# Altium PCB Grantv3.PcbDoc (part 5 of 5)
Units mil, origin at the board's own origin, x right, y up, seen from the top; angles counter-clockwise.
Board outline 3031.03 x 2829.03 mil, 2 copper layers (Top Layer, Bottom Layer); 187 components, 111 nets, 634 pads, 178 vias.
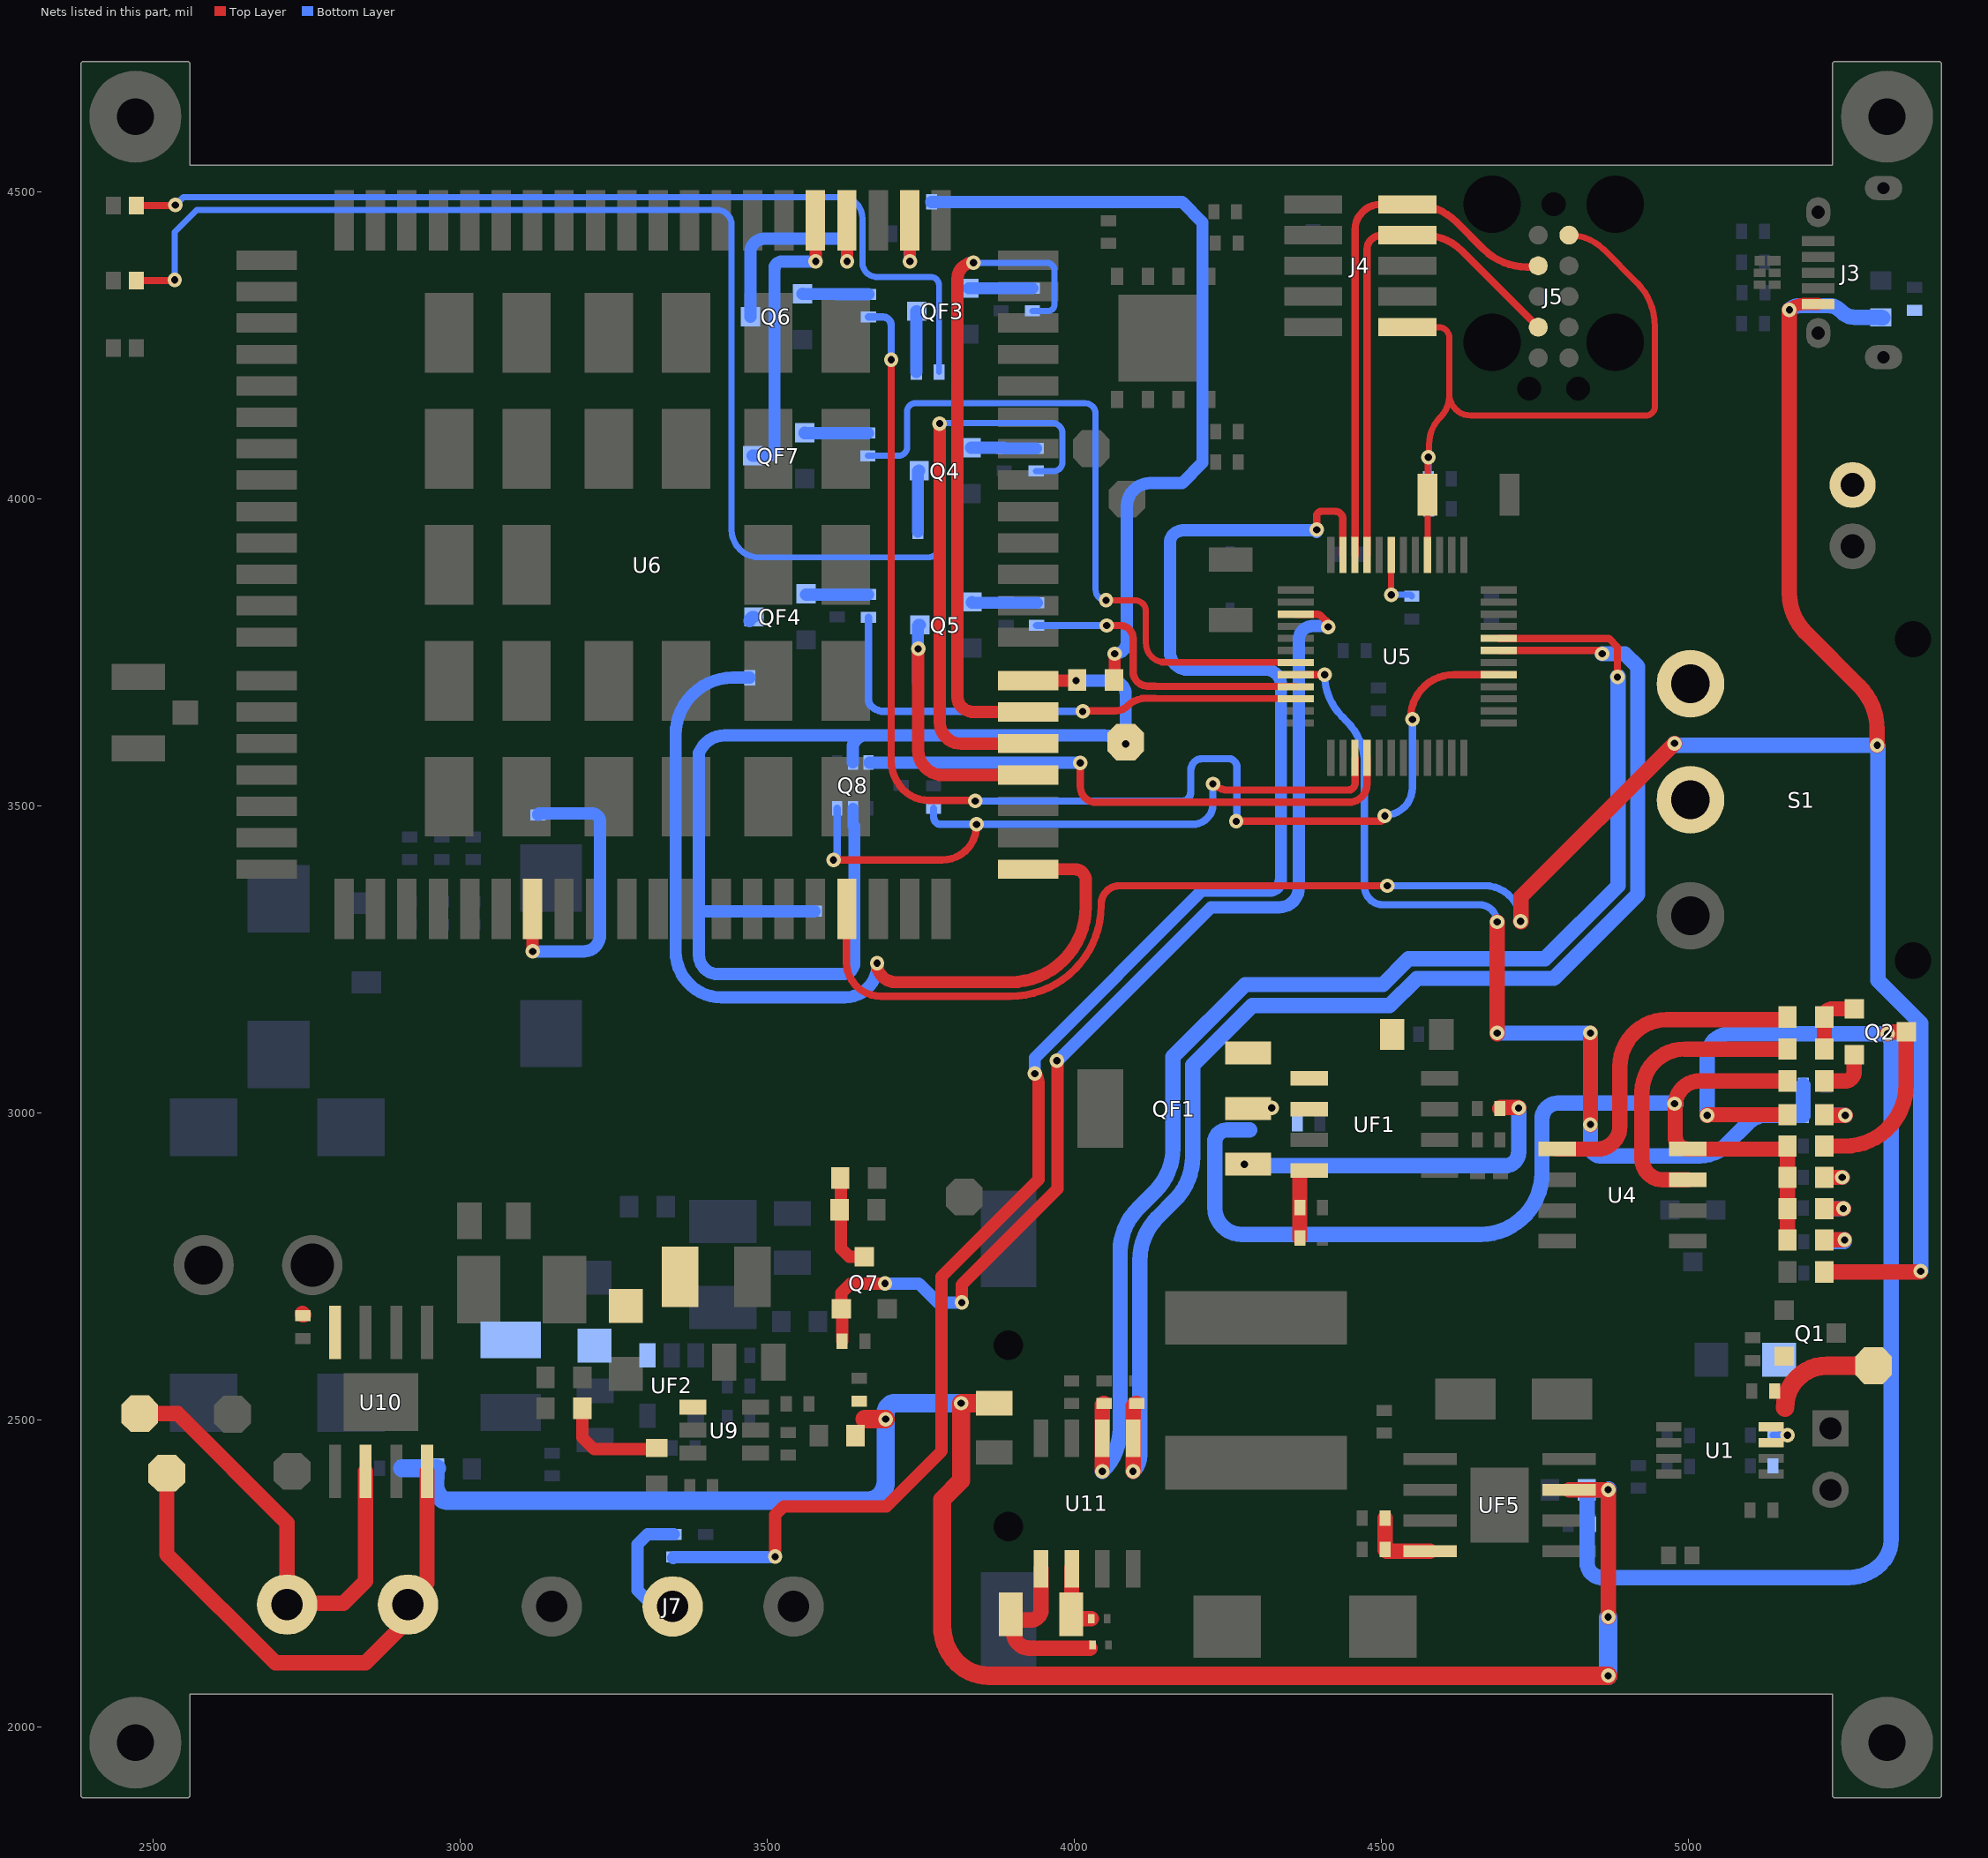
[diagram p3: the nets of this part, all layers, seen from the top]

## Via types
v1: diameter 23.62, hole 11.81, Top Layer to Bottom Layer, 178 vias

## Nets (pads, with @x,y where several pads share a name; then routed paths per layer and width w, separated by ;. In a path a pad name is that pad's centre, name@x,y a point inside that pad or via, vN(x,y) a via of type N, cw(c..) or ccw(c..) an arc to the next point about the centre after c; other vN are vias at no path point) (continued)
NetLED4_2: LED4.2 R11.2 | length 1972.4
  Top Layer w12: LED4.2@2471.64,4356 LED4.2@2472.64,4356 v1@2535,4356
  Bottom Layer w10: v1@2535,4358 2535,4435 2571,4471 3418.2,4471 cw(c3418.2,4447.2) 3442,4447.2 3442,3950 ccw(c3487,3950) 3487,3905 3762,3905 ccw(c3762,3925.5) 3782.5,3925.5 R11.2@3782.5,3947
  other v1: 2535,4357
NetLEDF1_2: LEDF1.2 R31.2 | length 1569.3
  Top Layer w12: LEDF1.2@2472.64,4478 v1@2536,4478
  Bottom Layer w10: v1(2536,4479) 2549,4492 3621,4492 cw(c3621,4458) 3655,4458 3655,4385 ccw(c3678,4385) 3678,4362 ; 3676,4362 3678,4362 ; R31.2@3780,4207 3780,4348 ccw(c3766,4348) 3766,4362 3678,4362
NETMODE_: R13.2 U6.5 | length 959
  Top Layer w20: v1(3781,4123) 3781,3637 ccw(c3816.7,3637) 3816.7,3601.3 U6.5@3924.68,3601.3
  Bottom Layer w10: v1@3780,4124 3964,4124 cw(c3964,4107) 3981,4107 3981,4060 cw(c3966.5,4060) 3966.5,4045.5 R13.2@3938,4045.5
NetQ2_1: Q2.1 SB16.2 SB17.2 | length 108.3
  Top Layer w25: SB17.2@5222,3104 SB16.2@5222,3156 cw(c5235.41,3156) 5235.41,3169.41 Q2.1@5270.68,3169.41
NetQ2_2: Q2.2 SB20.2 | length 84.7
  Top Layer w25: SB20.2@5222,3052 5255.32,3052 ccw(c5255.32,3067.35) 5270.68,3067.35 Q2.2@5270.68,3094.6
NetQ4_1: Q4.1 R13.1 R16.1 | length 106.2
  Bottom Layer w20: Q4.1@3832.32,4083.41 3885.09,4083.41 cw(c3885.09,4082.5) R16.1@3886,4082.5 R13.1@3938,4082.5
NetQ4_3: Q4.3 R11.1 | length 100.2
  Bottom Layer w20: R11.1@3745.5,3947 3745.5,4043.83 cw(c3747.68,4043.83) Q4.3@3747.68,4046.01
NetQ5_1: Q5.1 R14.1 R17.1 | length 106.5
  Bottom Layer w20: Q5.1@3833.32,3832.41 ccw(c3834.73,3832.41) 3834.73,3831 R14.1@3939,3831
NetQ6_1: Q6.1 R18.1 R19.1 | length 108.6
  Bottom Layer w20: Q6.1@3557.32,4334.41 3557.32,4334 R19.1@3613,4334 3613,4333.5 R18.1@3665,4333.5
NetQ7_3: Q7.3 SB_AD.2 SB_ZD.2 | length 157.1
  Top Layer w20: SB_ZD.2@3619,2892 3620,2891 3620,2779 3633.68,2765.32 Q7.3@3657.99,2765.32
NetQF1_1: QF1.1 RF2.1 | length 569.5
  Top Layer w25: v1(4277.17,2916.17) QF1.1@4277.17,2916.45 ; RF2.1@4693.56,3007 cw(c4695.56,3007) 4695.56,3009 4723,3009 cw(c4723,3007.94) v1(4724.06,3007.94)
  Bottom Layer w25: v1(4277.17,2916.17) cw(c4275,2916.17) 4275,2914 4702.06,2914 ccw(c4702.06,2936) 4724.06,2936 v1(4724.06,3007.94)
NetQF3_1: QF3.1 RF7.1 RF8.1 | length 103.7
  Bottom Layer w20: QF3.1@3828.32,4343.41 RF8.1@3881,4343.41 RF7.1@3932,4343.41
NetQF3_3: QF3.3 R31.1 | length 99.7
  Bottom Layer w20: R31.1@3743,4207 3743,4306.01 QF3.3@3743.68,4306.01
NetQF4_1: QF4.1 RF10.1 RF11.1 | length 100.8
  Bottom Layer w20: QF4.1@3563.32,3844.41 RF10.1@3664.09,3844.41
NetQF7_1: QF7.1 RF13.1 RF14.1 | length 103.3
  Bottom Layer w20: QF7.1@3561,4107.8 3561,4107.5 RF14.1@3612,4107.5 RF13.1@3664,4107.5
NetR6_2: R6.2 SB15.2 | length 64.2
  Top Layer w25: SB15.2@5222,2793 v1(5255,2793)
  Bottom Layer w25: R6.2@5225.5,2790 5252,2790 ccw(c5252,2793) v1(5255,2793)
NetR7_2: R7.2 SB19.2 | length 60.1
  Top Layer w25: SB19.2@5222,2844 v1(5253,2844)
  Bottom Layer w25: R7.2@5224.5,2845 ccw(c5225.5,2845) 5225.5,2844 v1(5253,2844)
NetR12_2: R12.2 SB4.2 | length 1301.1
  Top Layer w20: SB4.2@4064,3705 ccw(c4064,3707) 4066,3707 v1(4066,3748)
  Bottom Layer w20: R12.2@3767.5,4484 4176,4484 4209,4451 4209,4059 4176,4026 4124,4026 ccw(c4124,3988) 4086,3988 4086,3768 cw(c4066,3768) v1(4066,3748)
NetR21_1: R21.1 SB13.1 | length 176.9
  Top Layer w20: SB13.1@3199,2519 3199,2471 3218,2452 R21.1@3320,2452
NetR101_1: R101.1 U10.4 | length 3.1
  Top Layer w25: R101.1@2743,2673 ccw(c2745,2673) R101.1@2745,2671
NetRP1_2: RP1.2 SB18.2 | length 55.5
  Top Layer w25: SB18.2@5222,2895 v1(5251,2895)
  Bottom Layer w25: RP1.2@5224.5,2895 v1(5251,2895)
NetRP3_2: RP3.2 SB14.2 | length 66.1
  Top Layer w25: SB14.2@5222,2997 ccw(c5223,2997) 5223,2996 v1(5256,2996)
  Bottom Layer w25: RP3.2@5224.5,2996 v1(5256,2996)
NetSB16_1: SB16.1 U4.1 | length 539.7
  Top Layer w25: U4.1@4786.7,2941 4852,2941 ccw(c4852,2978) 4889,2978 4889,3075.19 cw(c4965.81,3075.19) 4965.81,3152 5158,3152 ccw(c5158,3156) SB16.1@5162,3156
NetSB17_1: SB17.1 U4.7 | length 479.8
  Top Layer w25: U4.7@4999.3,2891 4959,2891 cw(c4959,2925) 4925,2925 4925,3034.22 cw(c4994.77,3034.22) 4994.77,3104 SB17.1@5162,3104
NETSTATUS_: RF7.2 U6.6 | length 1130.4
  Top Layer w20: v1(3836,4385) ccw(c3836,4359) 3810,4359 3810,3676.49 ccw(c3830.49,3676.49) 3816,3662 ccw(c3837.73,3683.73) 3837.73,3653 U6.6@3931,3653 ; U6.6@3892.13,3652.87 U6.6@3925.07,3652.87
  Bottom Layer w10: v1@3835,4384 cw(c3837,4384) v1@3837,4386 ; v1(3836,4385) 3955,4385 cw(c3955,4372) 3968,4372 ; RF7.2@3932,4306.41 3957.41,4306.41 ccw(c3957.41,4317) 3968,4317 3968,4372 ; 3968,4373 3968,4372
NRST_: C18.1 J4.10 J5.10 R9.1 SW1.1 U5.40 | length 1241.7
  Top Layer w10: J4.10@4543,4280 4594,4280 cw(c4594,4263) 4611,4263 4611,4171 ; U5.40@4575.57,3908.83 SW1.1@4575.64,4007 SW1.1@4575.64,4007 4576,4007 v1@4576,4069 ; v1@4578,4068 4578,4088.13 cw(c4642.87,4088.13) 4597,4134 ccw(c4563.2,4167.8) 4611,4167.8 4611,4171 ; J5.10@4806,4430 cw(c4806,4350.33) 4862.33,4406.67 4916.71,4352.29 cw(c4846,4281.58) 4946,4281.58 4946,4151 cw(c4931,4151) 4931,4136 4646,4136 cw(c4646,4171) 4611,4171 ; v1@4576,4069 cw(c4576,4068) v1@4576.17,4068.98 ; v1@4576,4069 v1@4576.17,4068.98 ; v1@4576.17,4068.98 cw(c4576,4068) v1@4576.34,4068.94 ; v1@4576.17,4068.98 v1@4576.34,4068.94 ; v1@4576.34,4068.94 cw(c4576,4068) v1@4576.5,4068.87 ; v1@4576.34,4068.94 v1@4576.5,4068.87 ; v1@4576.5,4068.87 cw(c4576,4068) v1@4576.64,4068.77 ; v1@4576.5,4068.87 v1@4576.64,4068.77 ; v1@4576.64,4068.77 cw(c4576,4068) v1@4576.77,4068.64 ; v1@4576.77,4068.64 cw(c4576,4068) v1@4576.87,4068.5 ; v1@4576.77,4068.64 v1@4576.87,4068.5 ; v1@4576.87,4068.5 cw(c4576,4068) v1@4576.94,4068.34 ; v1@4576.87,4068.5 v1@4576.94,4068.34 ; v1@4576.94,4068.34 cw(c4576,4068) v1@4576.98,4068.17 ; v1@4576.94,4068.34 v1@4576.98,4068.17 ; v1@4576.98,4068.17 cw(c4576,4068) v1(4577,4068) v1@4576.98,4068.17
  Bottom Layer w10: v1(4577,4068) R9.1@4577,4033 4577,3984 C18.1@4577.5,3984
OUT_1: J8.1 P14.1 U10.6 | length 776.5
  Top Layer w25: P14.1@2475,2510 P14.1@2478,2510 2540,2510 2718,2332 J8.1@2718,2201 ; J8.1@2716,2201 J8.1@2718,2201 ; J8.1@2718,2196 J8.1@2718,2201 ; U10.6@2846,2415.81 2846,2237 2810,2201 J8.1@2718,2201
OUT_2: J8.2 P15.1 U10.8 | length 879.3
  Top Layer w25: P15.1@2522,2413 2522,2281 2699,2104 2846,2104 2920,2178 J8.2@2920,2192 ; J8.2@2911,2199 2946,2234 U10.8@2946,2415.81
PA2_: Q7.1 R26.1 U5.3 | length 1803.4
  Top Layer w12: U5.3@4361,3812.37 4394.86,3812.37 cw(c4394.86,3800.86) 4403,3809 4414.59,3797.41 cw(c4411.17,3794) 4416,3794 v1(4413.71,3791.71)
  Top Layer w20: R26.1@3622,2628 3622,2682 3620.59,2683.41 3620.59,2706.59 3636,2722 v1(3692,2722) ; v1(3817,2691) 3817,2720 3973,2876 3973,3086 v1(3972,3085)
  Bottom Layer w12: v1@4412,3791 ccw(c4412,3793.41) v1(4413.71,3791.71)
  Bottom Layer w20: v1(3692,2722) 3747,2722 3778,2691 v1(3817,2691) ; v1(3972,3085) 3973,3085 4223,3335 4334.04,3335 ccw(c4334.04,3366.96) 4366,3366.96 4366,3770.88 cw(c4388.12,3770.88) 4388.12,3793 v1@4413,3793
PA4_: R14.2 U5.9 | length 501.8
  Top Layer w12: v1(4053,3794) 4075,3794 cw(c4075,3773) 4096,3773 4096,3719 ccw(c4119.46,3719) 4119.46,3695.54 ; 4119,3695 4132.03,3695.06 U5.9@4361,3694.26
  Bottom Layer w12: R14.2@3939,3794 v1(4053,3794)
PA5_: RF10.2 U5.10 | length 845.4
  Top Layer w12: v1@4014,3655 4067.69,3655 ccw(c4067.69,3682.31) 4087,3663 cw(c4116.87,3633.13) 4116.87,3675.37 4131.96,3675.37 U5.10@4361,3674.57
  Bottom Layer w12: RF10.2@3665,3807.5 3665,3672.66 ccw(c3678.66,3672.66) 3669,3663 ccw(c3690.73,3684.73) 3690.73,3654 v1(4014,3654)
PA20_: R18.2 U5.29 | length 2121.7
  Top Layer w12: v1(3702,4227) 3702,3574.28 ccw(c3770.28,3574.28) 3722,3526 ccw(c3763.04,3567.04) 3763.04,3509 v1@3838,3509 ; v1@3838,3508 v1(3839,3508) ; v1(4264,3475) 4497,3475 ccw(c4497,3484) v1(4506,3484) ; v1(4551,3641) 4550,3641 4548,3643 cw(c4618.94,3643) 4618.94,3713.95 U5.29@4691.71,3713.95
  Bottom Layer w12: R18.2@3665,4296.5 3688.5,4296.5 cw(c3688.5,4283) 3702,4283 v1(3702,4227) ; v1(3839,3508) 4177.76,3508 ccw(c4177.76,3518.24) 4185,3511 ccw(c4172.93,3523.07) 4190,3523.07 4190,3557.51 cw(c4210.49,3557.51) 4196,3572 cw(c4208.07,3559.93) 4208.07,3577 4251.34,3577 cw(c4251.34,3563.34) 4261,3573 cw(c4251.34,3563.34) 4265,3563.34 v1@4265,3476 ; v1@4506,3485 ccw(c4506,3530) 4551,3530 v1(4551,3641)
PB8_: RF13.2 U5.7 | length 1165.1
  Top Layer w10: v1(4052,3835) 4099.1,3835 cw(c4099.1,3817.1) 4117,3817.1 4117,3765 ccw(c4148,3765) 4143.12,3734.39 ccw(c4148,3765) 4148,3734
  Top Layer w12: 4143.12,3734.39 4148,3734.37 U5.7@4361,3733.63
  Bottom Layer w10: RF13.2@3664,4070.5 3714,4070.5 ccw(c3714,4084.5) 3728,4084.5 3728,4143 cw(c3741,4143) 3741,4156 4017,4156 ; 4018,4156 cw(c4018,4139) 4035,4139 4035,3852 ccw(c4052,3852) v1(4052,3835) v1@4055.93,3835
PB9_: RP3.1 RP4.1 U5.8 | length 1605.8
  Top Layer w12: U5.8@4361,3713.94 v1(4408.06,3713.94)
  Top Layer w25: v1@4689,3129 v1(4689,3130) v1(4689,3311) ; v1(4841,2981) v1(4841,3130)
  Bottom Layer w12: v1(4408.06,3713.94) ccw(c4504.62,3713.94) 4436.34,3645.66 4443.71,3638.29 cw(c4373,3567.58) 4473,3567.58 4473,3369 ccw(c4503,3369) 4503,3339 4660,3339 cw(c4660,3310) v1@4689,3310
  Bottom Layer w25: v1(4689,3130) v1(4841,3130) ; v1(4841,2981) 4841,2946 ccw(c4857,2946) 4857,2930 5019.34,2930 ccw(c5019.34,2989.54) 5061.44,2947.44 5098,2984 cw(c5126.97,2955.03) 5126.97,2996 RP3.1@5187.5,2996 RP4.1@5187.5,3045
PWRKEY: QF7.3 U6.21 | length 476.6
  Top Layer w20: U6.21@3578.23,4454.43 U6.21@3578.61,4454.05 ; v1(3579,4387.09) U6.21@3579,4453.66
  Bottom Layer w20: QF7.3@3476.35,4070.4 3501.11,4070.4 ccw(c3501.11,4081.29) 3512,4081.29 3512,4375.09 cw(c3524,4375.09) 3524,4387.09 v1(3579,4387.09)
RESET_N: Q6.3 U6.20 | length 372.3
  Top Layer w20: v1(3630.18,4387.09) U6.20@3630.18,4453.66
  Bottom Layer w20: Q6.3@3472.68,4297.01 3472.68,4401.68 cw(c3495,4401.68) 3495,4424 3615.92,4424 cw(c3615.92,4409.73) 3630.18,4409.73 v1(3630.18,4387.09)
RXD: Q8.3 RS2.2 U5.15 | length 1167.4
  Top Layer w12: v1@3606,3414 ccw(c3608,3414) v1(3608,3412) 3785,3412 ccw(c3785,3468) v1@3841,3468 ; v1(3841,3470) v1@3842,3470 ; v1(4226,3536) ccw(c4250.14,3560.14) 4250.14,3526 4446.78,3526 ccw(c4446.78,3536.68) 4457.46,3536.68 U5.15@4457.46,3578.12
  Bottom Layer w12: v1(3608,3412) 3613,3412 ccw(c3613,3413) 3614,3413 Q8.3@3614,3496 ; RS2.2@3771,3496 3771,3482.66 ccw(c3784.66,3482.66) 3775,3473 ccw(c3782.24,3480.24) 3782.24,3470 v1(3841,3470) 4083.07,3470 ; 4084,3470 4192.86,3470 ccw(c4192.86,3504.14) 4217,3480 ccw(c4195.27,3501.73) 4226,3501.73 v1(4226,3536)
SCL_: R24.1 U5.32 U11.6 | length 2256.4
  Top Layer w12: U5.32@4691.71,3773 4727.91,3773 4871,3773 4885,3759 v1(4885,3710)
  Top Layer w25: v1@4046,2417 U11.6@4046,2470 R24.1@4046,2523.5 ; R24.1@4046,2523.5 cw(c4049,2523.5) R24.1@4046.05,2524.02 ; R24.1@4046,2523.5 R24.1@4046.05,2524.02 ; R24.1@4046.05,2524.02 cw(c4049,2523.5) R24.1@4046.18,2524.53 ; R24.1@4046.05,2524.02 R24.1@4046.18,2524.53 ; R24.1@4046.18,2524.53 cw(c4049,2523.5) R24.1@4046.4,2525 ; R24.1@4046.18,2524.53 R24.1@4046.4,2525 ; R24.1@4046.4,2525 cw(c4049,2523.5) R24.1@4046.7,2525.43 ; R24.1@4046.4,2525 R24.1@4046.7,2525.43 ; R24.1@4046.7,2525.43 cw(c4049,2523.5) R24.1@4047.07,2525.8 ; R24.1@4047.07,2525.8 cw(c4049,2523.5) R24.1@4047.5,2526.1 ; R24.1@4047.07,2525.8 R24.1@4047.5,2526.1 ; R24.1@4047.5,2526.1 cw(c4049,2523.5) R24.1@4047.97,2526.32 ; R24.1@4047.5,2526.1 R24.1@4047.97,2526.32 ; R24.1@4047.97,2526.32 cw(c4049,2523.5) R24.1@4048.48,2526.45 ; R24.1@4047.97,2526.32 R24.1@4048.48,2526.45 ; R24.1@4048.48,2526.45 cw(c4049,2523.5) R24.1@4049,2526.5 R24.1@4048.48,2526.45
  Bottom Layer w25: v1(4046,2416) ccw(c3975.99,2486.01) 4075,2486.01 4075,2773.74 cw(c4175,2773.74) 4104.29,2844.45 4131.71,2871.87 ccw(c4061,2942.58) 4161,2942.58 4161,3091.25 4278.75,3209 4502.75,3209 4544.75,3251 4767,3251 4886,3370 4886,3711 v1(4885,3710)
SDA_: R23.1 U5.31 U11.5 | length 2262.6
  Top Layer w12: U5.31@4691.71,3753.32 4854.69,3753.32 v1(4860,3748)
  Top Layer w25: v1(4096,2416) U11.5@4096,2470 R23.1@4096,2520.5 ; R23.1@4096,2520.5 cw(c4102,2520.5) R23.1@4096.09,2521.54 ; R23.1@4096,2520.5 R23.1@4096.09,2521.54 ; R23.1@4096.09,2521.54 cw(c4102,2520.5) R23.1@4096.36,2522.55 ; R23.1@4096.09,2521.54 R23.1@4096.36,2522.55 ; R23.1@4096.36,2522.55 cw(c4102,2520.5) R23.1@4096.8,2523.5 ; R23.1@4096.36,2522.55 R23.1@4096.8,2523.5 ; R23.1@4096.8,2523.5 cw(c4102,2520.5) R23.1@4097.4,2524.36 ; R23.1@4096.8,2523.5 R23.1@4097.4,2524.36 ; R23.1@4097.4,2524.36 cw(c4102,2520.5) R23.1@4098.14,2525.1 ; R23.1@4098.14,2525.1 cw(c4102,2520.5) R23.1@4099,2525.7 ; R23.1@4098.14,2525.1 R23.1@4099,2525.7 ; R23.1@4099,2525.7 cw(c4102,2520.5) R23.1@4099.95,2526.14 ; R23.1@4099,2525.7 R23.1@4099.95,2526.14 ; R23.1@4099.95,2526.14 cw(c4102,2520.5) R23.1@4100.96,2526.41 ; R23.1@4099.95,2526.14 R23.1@4100.96,2526.41 ; R23.1@4100.96,2526.41 cw(c4102,2520.5) R23.1@4102,2526.5 R23.1@4100.96,2526.41
  Bottom Layer w25: v1(4096,2416) ccw(c4069.44,2442.56) 4107,2442.56 4107,2759.58 cw(c4207,2759.58) 4136.29,2830.29 4163.71,2857.71 ccw(c4093,2928.42) 4193,2928.42 4193,3078 4290,3175 4514,3175 4558,3219 4781,3219 4918,3356 4918,3727 4897,3748 v1(4860,3748)
SENS_IN: J7.2 R27.2 | length 211
  Bottom Layer w20: J7.2@3348,2195 3316,2195 3289,2222 3289,2297 3305.5,2313.5 R27.2@3348,2313.5
SNS_: QF1.3 RF1.1 UF1.1
STATUS_: R10.1 U6.61 | length 492
  Top Layer w20: U6.61@3117.98,3332 v1(3118,3263) ; v1(3118,3263) ccw(c3119,3263) 3119,3262 cw(c3119,3263.02) v1(3118,3263)
  Bottom Layer w20: v1(3118,3263) 3201,3263 ccw(c3201,3290) 3228,3290 3228,3474 ccw(c3214,3474) 3214,3488 3129.5,3488 ccw(c3129.5,3485.5) R10.1@3127,3485.5
SW_AD: D3.A L1.2 U9.1
SW_ZD: D3Z.A LZ.2 UF2.1
SWDCLK: J4.4 J5.4 U5.45 | length 805.2
  Top Layer w12: U5.45@4477.14,3908.83 4477.14,4407.14 cw(c4499,4407.14) J4.4@4499,4429 ; J4.4@4543,4430 4569.23,4430 cw(c4569.23,4341.23) 4632,4404 4752.88,4283.12 ccw(c4758,4288.24) J5.4@4758,4281
SWDIO: J4.2 J5.2 U5.46 | length 841.5
  Top Layer w12: U5.46@4457.46,3908.83 4457.46,4438.46 cw(c4499,4438.46) J4.2@4499,4480 ; J4.2@4543,4480 4552.58,4480 cw(c4552.58,4380) 4623.29,4450.71 4666.71,4407.29 ccw(c4737.42,4478) 4737.42,4378 J5.2@4756,4378
TS_: RF3.1 RF4.1 UF1.4 | length 105
  Top Layer w25: RF3.1@4367.5,2796 RF4.1@4367.5,2846 UF1.4@4367.5,2901
TXD: Q8.6 RS4.2 U5.16 | length 928.5
  Top Layer w12: v1@4008,3571 v1@4010,3569 ; v1(4010,3570) v1@4010,3569 ; U5.16@4477.14,3578.12 4477.14,3535.61 cw(c4447.54,3535.61) 4447.54,3506 4034.9,3506 cw(c4034.9,3529.9) 4018,3513 cw(c4037.31,3532.31) 4010,3532.31 v1@4010,3569
  Bottom Layer w20: Q8.6@3666.59,3570.5 RS4.2@3718,3570.5 4003.96,3570.5 cw(c4003.96,3561.96) 4010,3568 v1(4010,3570)
USB_BOOT: D4.1 R12.1 U6.115 | length 161.4
  Top Layer w20: v1(3732.54,4387.09) U6.115@3732.54,4453.66
  Bottom Layer w20: v1@3732.5,4389.14 R12.1@3732.5,4484
VBAT: C36.1 C40.1 CF1.1 CF2.1 CR1.1 Q2.3 SB2.2 SB5.1 SB6.1 SB14.1 UF5.7 | length 5422.8
  Top Layer w25: UF5.7@4806.19,2386 v1(4870,2386) v1(4870,2179) ; v1(5031,2996) cw(c5032,2996) 5032,2997 SB14.1@5162,2997 ; SB2.2@5222,2946 5255.32,2946 ccw(c5255.32,3046) 5355.32,3046 Q2.3@5355.32,3132.01 5328.01,3132.01 ccw(c5328.01,3129) v1(5325,3129)
  Top Layer w30: 3659,2501 v1(3693,2501) ; C40.1@3874,2527 C40.1@3870,2527 v1(3816,2527) 3816,2401 3785,2370 3785,2164.36 ccw(c3870.36,2164.36) 3810,2104 ccw(c3860.7,2154.7) 3860.7,2083 v1(4870,2083)
  Bottom Layer w25: CF2.1@4835,2386 v1(4870,2386) ; CF2.1@4835.5,2379.5 4835.5,2267.16 ccw(c4859.66,2267.16) 4859.66,2243 ; 4858,2243 4859.66,2243 ; v1(5031,2996) 5031,3091 cw(c5069,3091) 5069,3129 v1(5325,3129) ; v1@5324,3128 cw(c5307.1,3111.1) 5331,3111.1 5331,2306.04 cw(c5272.96,2306.04) 5314,2265 cw(c5260.89,2318.11) 5260.89,2243 4859.66,2243 ; v1(4870,2386) ccw(c4870,2387) 4871,2387 cw(c4870,2387) v1(4870,2386)
  Bottom Layer w30: CR1.1@2906,2421 SB6.1@2962,2421 ; SB6.1@2959,2414 2959,2394.73 ccw(c2989.73,2394.73) 2968,2373 ccw(c2980.07,2385.07) 2980.07,2368 3662.27,2368 ccw(c3662.27,2398.73) 3684,2377 ccw(c3662.27,2398.73) 3693,2398.73 v1(3693,2501) 3693,2510.93 cw(c3710.07,2510.93) 3698,2523 cw(c3707.66,2513.34) 3707.66,2527 v1@3814.5,2527 ; v1(4870,2083) v1@4870,2178
VBAT_IN: C10.1 QF1.2 S1.2 SB2.1 SB15.1 SB18.1 SB19.1 SB20.1 U4.8 UF1.2 | length 1752.1
  Top Layer w25: SB20.1@5162,3052 5019,3052 ; SB15.1@5164,2792 cw(c5164,2794) 5162,2794 SB19.1@5162,2844 SB18.1@5162,2895 SB2.1@5162,2946 ; 4979,2961.3 ccw(c4999.3,2961.3) 4979.31,2957.77 ; 4979,2961.3 v1@4979,3012 ; 4979,2961.3 4979.31,2957.77 ; v1@4979,3012 cw(c5019,3012) v1@4979.61,3018.95 ; v1@4979,3012 4979.25,3014.89 v1@4979.61,3018.95 ; 4979.31,2957.77 ccw(c4999.3,2961.3) U4.8@4995.77,2941.31 ; v1@4979.61,3018.95 cw(c5019,3012) 5012.05,3051.39 ; U4.8@4995.77,2941.31 ccw(c4999.3,2961.3) U4.8@4999.3,2941 ; U4.8@4995.77,2941.31 U4.8@4999.3,2941 ; U4.8@4999.3,2941 SB2.1@5157,2941 ; 5012.05,3051.39 cw(c5019,3012) 5019,3052 ; 5012.05,3051.39 5019,3052 ; SB2.1@5157,2941 ccw(c5157,2946) SB2.1@5157.87,2941.08 ; SB2.1@5157,2941 SB2.1@5157.87,2941.08 ; SB2.1@5157.87,2941.08 ccw(c5157,2946) SB2.1@5158.71,2941.3 ; SB2.1@5157.87,2941.08 SB2.1@5158.71,2941.3 ; SB2.1@5158.71,2941.3 ccw(c5157,2946) SB2.1@5159.5,2941.67 ; SB2.1@5158.71,2941.3 SB2.1@5159.5,2941.67 ; SB2.1@5159.5,2941.67 ccw(c5157,2946) SB2.1@5160.21,2942.17 ; SB2.1@5159.5,2941.67 SB2.1@5160.21,2942.17 ; SB2.1@5160.21,2942.17 ccw(c5157,2946) SB2.1@5160.83,2942.79 ; SB2.1@5160.83,2942.79 ccw(c5157,2946) SB2.1@5161.33,2943.5 ; SB2.1@5160.83,2942.79 SB2.1@5161.33,2943.5 ; SB2.1@5161.33,2943.5 ccw(c5157,2946) SB2.1@5161.7,2944.29 ; SB2.1@5161.33,2943.5 SB2.1@5161.7,2944.29 ; SB2.1@5161.7,2944.29 ccw(c5157,2946) SB2.1@5161.92,2945.13 ; SB2.1@5161.7,2944.29 SB2.1@5161.92,2945.13 ; SB2.1@5161.92,2945.13 ccw(c5157,2946) SB2.1@5162,2946 ; SB2.1@5161.92,2945.13 SB2.1@5162,2946
  Bottom Layer w25: 4286,2972.15 4249.15,2972.15 ccw(c4249.15,2952) 4229.31,2955.5 ; v1@4980,3014 ccw(c4978,3014) 4978,3016 4788.49,3016 ccw(c4788.49,2989.51) 4762,2989.51 4762,2902 cw(c4662,2902) 4662,2802 4273,2802 cw(c4273,2846) 4229,2846 4229,2952 ; 4229,2952 cw(c4249.15,2952) 4229.31,2955.5 ; 4229,2952 4229.31,2955.5
  other v1: 4322,3008 4978,3015
VBAT_M: P17.1 S1.1
VDD_C: C15.1 U5.43 | length 104.7
  Top Layer w10: v1@4516.51,3839 v1(4516.51,3844) U5.43@4516.51,3908.83
  Bottom Layer w10: v1(4516.51,3844) 4547.5,3844 cw(c4547.5,3841.5) C15.1@4550,3841.5
VDD_EXT: C7.2 C8.2 P3.1 Q8.2 Q8.5 RS1.1 RS3.1 SB4.1 U6.7 | length 2073.5
  Top Layer w20: U6.7@3925.07,3704.05 4003.05,3704.05 v1(4003.29,3704.29)
  Bottom Layer w18: 3639.59,3467.19 Q8.2@3639.59,3496
  Bottom Layer w20: RS1.1@3476.5,3328.5 RS1.1@3477,3328.5 ; C8.2@3576.79,3328.5 C7.2@3526.5,3328.5 RS1.1@3477,3328.5 ; Q8.5@3639.59,3570.8 3639.59,3594.94 cw(c3658.06,3594.94) 3642.77,3605.3 ; 3642,3467.19 3642,3245 cw(c3623,3245) 3623,3226 3420,3226 cw(c3420,3257) 3389,3257 3389,3328.5 ; 3645,3608 ccw(c3658.06,3594.94) 3642.77,3605.3 ; v1(4003.29,3704.29) 4060.39,3704.29 cw(c4060.39,3679.39) 4078,3697 cw(c4063.51,3682.51) 4084,3682.51 ; v1(4084,3601) 4084,3682 ; v1@4085,3600 ccw(c4048.79,3563.79) 4048.79,3615 3659.91,3615 ; 3389,3328.5 3389,3586.16 cw(c3431,3570) 3431,3615 3659.91,3615 ; 3389,3328.5 RS3.1@3426,3328.5 RS1.1@3477,3328.5 ; 3642.77,3605.3 cw(c3659.91,3595) 3659.91,3615
VDR_Out: R27.1 R28.1 U5.47 | length 2880
  Top Layer w12: v1@4394,3950 ccw(c4394,3951) 4395,3951 4395,3972 cw(c4403,3972) 4403,3980 4425,3980 cw(c4425,3967.23) 4437.77,3967.23 U5.47@4437.77,3908.83
  Top Layer w20: v1(3513,2277) 3513,2345 3527,2359 3694,2359 3784,2449 3784,2733.53 3942,2891.53 3942,3049.51 ccw(c3921.51,3049.51) v1(3936,3064)
  Bottom Layer w20: R27.1@3347,2275 R27.1@3348.5,2276.5 ; R27.1@3348,2276.5 R27.1@3348.5,2276.5 ; v1(3513,2277) 3512.5,2276.5 R28.1@3400,2276.5 R27.1@3348.5,2276.5 ; v1@3936,3063 v1(3936,3064) 3936,3089.74 4208.26,3362 4318,3362 ccw(c4318,3381) 4337,3381 4337,3697.17 ccw(c4312.17,3697.17) 4312.17,3722 4185,3722 cw(c4185,3751) 4156,3751 4156,3928.07 cw(c4176.93,3928.07) 4176.93,3949 4392,3949 cw(c4392,3946) 4395,3946 v1(4395,3950)
VIN: C1.1 C2.1 D1.K P2.1 Q1.2 RR1.2 U1.7 U1.8 | length 211.3
  Top Layer w30: 5158,2520 cw(c5226,2520) 5226,2588 P2.1@5302,2588
  Bottom Layer w12: C2.1@5138.5,2475 v1(5162,2475) v1@5167,2475
VSNS_: RF5.2 RF6.2 UF5.4 | length 126
  Top Layer w25: RF5.2@4506.5,2340 RF6.2@4506.5,2289 ccw(c4509.5,2289) 4509.5,2286 UF5.4@4579.81,2286
VUSB: C30.1 C31.1 J3.1 SB1.1 U6.71 | length 4132
  Top Layer w12: U6.71@3629,3331 3629,3246 ccw(c3685,3246) 3685,3190 3895.98,3190 ccw(c3895.98,3338.02) 4044,3338.02 4044,3340 cw(c4074,3340) 4074,3370 4206,3370 ; 4207,3370 v1(4510,3370)
  Top Layer w20: v1(5165,4308) cw(c5188.27,4284.73) 5188.27,4317.64 J3.1@5212,4317.64
  Top Layer w25: v1(4727,3312) 4728,3311 4728,3352 v1(4978,3602) ; v1(5165,4308) 5165,3847.18 ccw(c5257.18,3847.18) 5169.6,3818.41 ; 5192,3782 cw(c5257.18,3847.18) 5169.6,3818.41 ; SB1.1@5222,2741 v1@5378,2741 ; v1(5308,3599) 5308,3624.58 ccw(c5208,3624.58) 5278.71,3695.29 5193.29,3780.71 cw(c5264,3851.42) 5169.6,3818.42
  Bottom Layer w12: v1(4510,3370) 4669,3370 cw(c4669,3312) v1(4727,3312)
  Bottom Layer w25: v1(4978,3602) 4981,3599 v1(5308,3599) cw(c5305.59,3596.59) 5309,3596.59 5309,3216 5379,3146 v1(5379,2742) ; v1(5165,4308) cw(c5181.9,4291.1) 5181.9,4315 5229,4315 cw(c5229,4288.44) 5247.78,4307.22 5250,4305 ccw(c5271.73,4326.73) 5271.73,4296 C31.1@5314,4296 ; C31.1@5314,4295 C31.1@5317,4295
W_DISABLE: C27.2 Q5.3 U6.4 | length 470.2
  Top Layer w20: v1(3746,3756) 3746,3591 ccw(c3786.88,3591) 3786.88,3550.12 ; 3788,3550.12 U6.4@3924.68,3550.12
  Bottom Layer w10: C27.2@3745.5,3697 C27.2@3745.5,3700.5
  Bottom Layer w20: C27.2@3745.5,3700.5 Q5.3@3745.5,3791.83 ; Q5.3@3745.5,3791.83 cw(c3748.68,3791.83) Q5.3@3745.55,3792.38 ; Q5.3@3745.5,3791.83 Q5.3@3745.55,3792.38 ; Q5.3@3745.55,3792.38 cw(c3748.68,3791.83) Q5.3@3745.69,3792.92 ; Q5.3@3745.55,3792.38 Q5.3@3745.69,3792.92 ; Q5.3@3745.69,3792.92 cw(c3748.68,3791.83) Q5.3@3745.93,3793.42 ; Q5.3@3745.69,3792.92 Q5.3@3745.93,3793.42 ; Q5.3@3745.93,3793.42 cw(c3748.68,3791.83) Q5.3@3746.24,3793.87 ; Q5.3@3745.93,3793.42 Q5.3@3746.24,3793.87 ; Q5.3@3746.24,3793.87 cw(c3748.68,3791.83) Q5.3@3746.63,3794.26 ; Q5.3@3746.63,3794.26 cw(c3748.68,3791.83) Q5.3@3747.09,3794.58 ; Q5.3@3746.63,3794.26 Q5.3@3747.09,3794.58 ; Q5.3@3747.09,3794.58 cw(c3748.68,3791.83) Q5.3@3747.59,3794.81 ; Q5.3@3747.09,3794.58 Q5.3@3747.59,3794.81 ; Q5.3@3747.59,3794.81 cw(c3748.68,3791.83) Q5.3@3748.13,3794.96 ; Q5.3@3747.59,3794.81 Q5.3@3748.13,3794.96 ; Q5.3@3748.13,3794.96 cw(c3748.68,3791.83) Q5.3@3748.68,3795.01 Q5.3@3748.13,3794.96
WAKEUP: CF6.2 QF4.3 U6.1 | length 1525
  Top Layer w20: v1@3679,3243 ccw(c3709,3243) 3709,3213 3896.01,3213 ccw(c3896.01,3335.99) 4019,3335.99 4019,3379 ccw(c4001.04,3379) 4001.04,3396.96 U6.1@3925.07,3396.96
  Bottom Layer w20: CF6.2@3471.5,3709 3444,3709 ccw(c3444,3616) 3351,3616 3351,3263 ccw(c3426,3263) 3426,3188 3626,3188 ccw(c3626,3242) v1@3680,3242 ; QF4.3@3471.61,3802.08 ccw(c3478.68,3800.83) 3471.5,3800.83 QF4.3@3471.61,3802.08 ; QF4.3@3471.61,3802.08 cw(c3478.68,3800.83) QF4.3@3471.93,3803.28 ; QF4.3@3471.61,3802.08 QF4.3@3471.93,3803.28 ; QF4.3@3471.93,3803.28 cw(c3478.68,3800.83) QF4.3@3472.46,3804.42 ; QF4.3@3471.93,3803.28 QF4.3@3472.46,3804.42 ; QF4.3@3472.46,3804.42 cw(c3478.68,3800.83) QF4.3@3473.18,3805.44 ; QF4.3@3472.46,3804.42 QF4.3@3473.18,3805.44 ; QF4.3@3473.18,3805.44 cw(c3478.68,3800.83) QF4.3@3474.06,3806.33 ; QF4.3@3474.06,3806.33 cw(c3478.68,3800.83) QF4.3@3475.09,3807.04 ; QF4.3@3474.06,3806.33 QF4.3@3475.09,3807.04 ; QF4.3@3475.09,3807.04 cw(c3478.68,3800.83) QF4.3@3476.22,3807.57 ; QF4.3@3475.09,3807.04 QF4.3@3476.22,3807.57 ; QF4.3@3476.22,3807.57 cw(c3478.68,3800.83) QF4.3@3477.43,3807.9 ; QF4.3@3476.22,3807.57 QF4.3@3477.43,3807.9 ; QF4.3@3477.43,3807.9 cw(c3478.68,3800.83) QF4.3@3478.68,3808.01 QF4.3@3477.43,3807.9
  other v1: 3679,3244
X1: CX1.2 U11.1 X3.2 | length 298.8
  Top Layer w25: X3.2@3891.79,2174 X3.2@3897.53,2174 ; X3.2@3896.79,2183 ccw(c3951.72,2183) X3.2@3897.53,2174 ; 3946,2190 cw(c3930,2190) 3930,2174 X3.2@3897.53,2174 ; 3946,2191 U11.1@3946,2257.4 ; CX1.2@4026,2128.07 3926.85,2128.07 cw(c3926.85,2153.65) 3901.61,2149.46 X3.2@3897.53,2174
X2: CX2.2 U11.2 X3.1 | length 122.8
  Top Layer w12: X3.1@3996,2179.79 ccw(c3999.79,2179.79) X3.1@3999.79,2176
  Top Layer w25: X3.1@3990.21,2174 cw(c3992.21,2174) 3992.21,2176 3999.79,2176 CX2.2@4028.02,2176 ; X3.1@3996,2179.79 U11.2@3996,2257.7
pads on no net: J2.MH1 J2.MH2 J3.4 J4.6 J4.7 J4.8 J5.6 J5.7 J5.8 J5.9 J5.MP1 J5.MP2 J5.MP3 J5.MP4 J5.MP5 J5.MP6 J5.MP7 J6.MH1 J6.MH2 QF1.4 S1.3 S1.MH1 S1.MH2 U2.3 U2.4 U2.5 U2.6 U5.4 U5.11 U5.12 U5.13 U5.14 U5.20 U5.21 U5.22 U5.23 U5.25 U5.26 U5.28 U5.30 U5.37 U5.38 U5.39 U5.41 U5.48 U6.2 U6.3 U6.13 U6.18 U6.23 U6.24 U6.25 U6.26 U6.27 U6.28 U6.29 U6.30 U6.31 U6.32 U6.33 U6.34 U6.35 U6.37 U6.38 U6.39 U6.40 U6.41 U6.42 U6.43 U6.44 U6.45 U6.47 U6.55 U6.62 U6.63 U6.64 U6.65 U6.66 U6.113 U6.114 U6.116 U6.141 U6.142 U6.143 U6.144 U8.2 U8.4 U8.5 U8.9 U9.6 UF5.2 UF5.3 UF5.5

## Other copper
Top Layer:
  rectangle net VBAT: 3627,2448 3676,2540
  rectangle net GND: 3626,2553 3670,2594
  rectangle net GND: 3646,2553 3711,2648
  rectangle net 12V: 2696,2384 2767,2455
  rectangle net CHG_IN: 3815,3106 3996,3176
  rectangle net CHG_IN: 3731,3010 3833,3176
  rectangle net CHG_IN: 3965,3147 4137,3177
  rectangle net CHG_IN: 4067,3147 4226,3216
  rectangle net CHG_IN: 4067,3173 4629,3217
  rectangle net CHG_IN: 2635,2994 3834,3050
  rectangle net CHG_IN: 2634,2809 2705,3050
  rectangle net GND: 3633,3437 3712,3505
  rectangle net #U_VDD: 4037,4360 4083,4428
  rectangle net 3V8: 2898,3242 3088,3380
  rectangle net GND: 3009,3543 3602,4219
  rectangle net 3V3: 4652,3846 4751,3943
  rectangle net GND: 5225,3878 5339,3972
  rectangle net GND: 5313,3877 5377,4255
  rectangle net GND: 5281,4201 5355,4434
  rectangle net GND: 5190,4201 5350,4297
  rectangle net GND: 2400,2606 2516,3174
  rectangle net GND: 2455,2606 2689,2676
  rectangle net GND: 2602,2478 2691,2676
  rectangle net NetR101_1: 2723,2653 2808,2686
  rectangle net GND: 2972,2110 3091,2520
  rectangle net GND: 2972,2079 3529,2132
  rectangle net GND: 3410,2076 3601,2169
  rectangle net GND: 2958,2479 3111,2540
  rectangle net GND: 2647,2477 2976,2585
  rectangle net 12V: 2744,2264 2822,2470
  rectangle net GND: 3410,2142 3601,2253
  rectangle net 12V: 2989,2847 3056,2906
  rectangle net GND: 3357,2472 3444,2493
  rectangle net 12V: 2990,2547 3167,2630
  rectangle net 12V: 2989,2550 3058,2862
  rectangle net GND: 3095,2647 3213,2868
  rectangle net GND: 3205,2828 3586,2868
  rectangle net GND: 3550,2509 3586,2830
  rectangle net 3V3AD: 3511,2468 3542,2555
  rectangle net 3V3AD: 3480,2548 3543,2668
  rectangle net 3V3AD: 3443,2659 3543,2817
  rectangle net GND: 3409,2131 3451,2558
  rectangle net GND: 3397,2547 3464,2645
  rectangle net GND: 3396,2551 3435,2845
  rectangle net 12V: 3118,2164 3170,2631
  rectangle net NetD3_K: 3183,2548 3308,2633
  rectangle net SW_AD: 3328,2505 3387,2667
  rectangle net SW_AD: 3224,2652 3388,2820
  rectangle net FB_: 3353,2393 3388,2459
  rectangle net FB_: 3295,2369 3389,2422
  region net GND: 5355,4527 5180,4527 5180,4412 5355,4412
  rectangle net BOOT: 4138,2499 4573,2595
  rectangle net CHG_IN: 4559,3043 4631,3217
  rectangle net SNS_: 4361,3089 4547,3164
  rectangle net VBAT_IN: 4230,2983 4416,3033
  rectangle net SNS_: 4234,3041 4416,3164
  rectangle net GND: 4438,2109 4722,2240
  rectangle net GND: 4643,2109 4722,2568
  rectangle net BOOT: 4136,2579 4902,2761
  rectangle net BOOT: 4744,2429 4904,2589
  rectangle net 3V8: 4139,2110 4413,2369
  rectangle net 3V8: 4139,2324 4479,2488.39
  rectangle net 3V3: 4914,2428 4992,2501
  rectangle net VIN: 5095,2453.2 5177,2518
  rectangle net VIN: 5130,2456 5177,2630
Bottom Layer:
  rectangle net GND: 5288,4330 5392,4381
  rectangle net VUSB: 5288,4271 5392,4322
  rectangle net VBAT: 4822,2305 4888,2409
  rectangle net GND: 3491,2069 3929,2249
  rectangle net COIN_VBAT: 3794,2714 3933,2878
  rectangle net GND: 4467,3678 4534,3818
  rectangle net GND: 4283,4414 4407,4450
  rectangle net WAKEUP: 3456,3695 3487,3824
  rectangle net GND: 2610,3192 2906,3266
  rectangle net GND: 2896,3194 3039,3316
  rectangle net GND: 2895,3437 3042,3507
  rectangle net VBAT_M: 5226,3738 5329,3875
  rectangle net VBAT_M: 4949,3642 5329,3761
  rectangle net VBAT_M: 5318,3813 5391,4064
  rectangle net VBAT_M: 5223,3978 5391,4066
  rectangle net VBAT_IN: 4942,3451 5184,3571
  rectangle net VBAT_IN: 5077,3239 5185,3571
  rectangle net VBAT_IN: 4975,3151 5186,3251
  rectangle net VBAT_IN: 4867,2970 5005,3236
  rectangle net CHG_IN: 2641,2613 2700,2886
  rectangle net CHG_IN: 2528,2457 2935,2652
  rectangle net GND: 2398,2917 3243,3231
  rectangle net GND: 3885,2069 4721,2249
  rectangle net 12V: 2747,2265 3198,2346
  rectangle net 12V: 3091,2146 3202,2344
  rectangle net 12V: 2996,2879 3381,2906
  rectangle net 12V: 3318,2850 3382,2905
  region net NetD3Z_K: 3257,2870 2996,2870 2996,2692 3257,2692
  region net 3V3ZD: 3323,2516 2995,2516 2995,2430 3323,2430
  region net SW_ZD: 3321,2626 2998,2626 2998,2586 3321,2586
  region net SW_ZD: 3257,2685 2996,2685 2996,2588 3257,2588
  region net GND: 3579,2775 3265,2775 3265,2690 3579,2690
  region net 12V: 3580,2865 3317,2865 3317,2785 3580,2785
  region net NetD3Z_K: 3306,2872 3155,2872 3155,2782 3306,2782
  region net GND: 3400,2576 3182,2576 3182,2538 3400,2538
  region net 3V3ZD: 3162,2556 2995,2556 2995,2480 3162,2480
  region net GND: 3380,2708 3265,2708 3265,2635 3380,2635
  region net GND: 3360,2717 3331,2717 3331,2483 3360,2483
  region net 3V3ZD: 3126,2437 2996,2437 2996,2399 3126,2399
  rectangle net GND: 4702,2313 4813,2416
  rectangle net GND: 4382,2951 4417,3022
  rectangle net VBAT_IN: 4251,2951 4373,3021
  rectangle net 3V3: 4915,2411 4986,2501
  rectangle net GND: 4994,2406 5113,2498
  rectangle net VIN: 5123,2407 5181,2639
  region net 3V8: 3197,3328 3197,3424 2650,3424 2650,3328

## Silkscreen, mask and mechanical layers (free items; w line width, h text height)
Top Overlay:
  lines w10: 4721,2941 4721,2964 4744,2987 4744,2994
  text "NET_S" at 2415,4413 h45
  text "NET_M" at 2415,4291 h45
  text "STAT" at 2415,4189 h45
  text "D_TXD" at 4067,4060 h45
  text "++" at 5117,3991 h45 r90
  text "D_RXD" at 4126,3979 h45
  text "--" at 5117,3888 h45 r90
  text "Battery Input" at 5192,3819 h45 r90
  text "VDD-EXT" at 4125,3582 h45
  text "ON" at 4950,3531 h45 r90
  text "OFF" at 4950,3341 h45 r90
  text "COIN_PWR" at 3712,2900 h45
  text "V_IN" at 5263,2626 h45
  text "OP_1" at 2501,2545 h45 r90
  text "GND" at 2650,2544 h45 r90
  text "12V" at 2747,2450 h45 r90
  text "OP_2" at 2544,2262 h45 r90
  text "3V3 POWER" at 4947,2213 h45
Bottom Overlay:
  drawing of 3083 lines, arcs and shapes, not listed
  text "0R 0402" at 5071,4263 h45 r90
  text "ZERO CARBON FOOTPRINT" at 3334,3798 h38
Mechanical 2:
  lines w10: 2387,2058 2387,4539 ; 2387,2063 2387,1889 2555,1889 2555,2057 ; 2387,4534 2387,4708 2555,4708 2555,4540 ; 2555,2058 5240,2058 ; 2555,4539 5240,4539 5240,4708 5408,4708 5408,4534 ; 5240,2057 5240,1889 5408,1889 5408,2063 ; 5408,2058 5408,4539